# Altium PCB ScreenerMobo.PcbDoc (part 2 of 5)
Units mm, origin at the board's own origin, x right, y up, seen from the top; angles counter-clockwise.
Board outline 145 x 180 mm, 2 copper layers (Top Layer, Bottom Layer); 434 components, 355 nets, 1806 pads, 3000 vias.
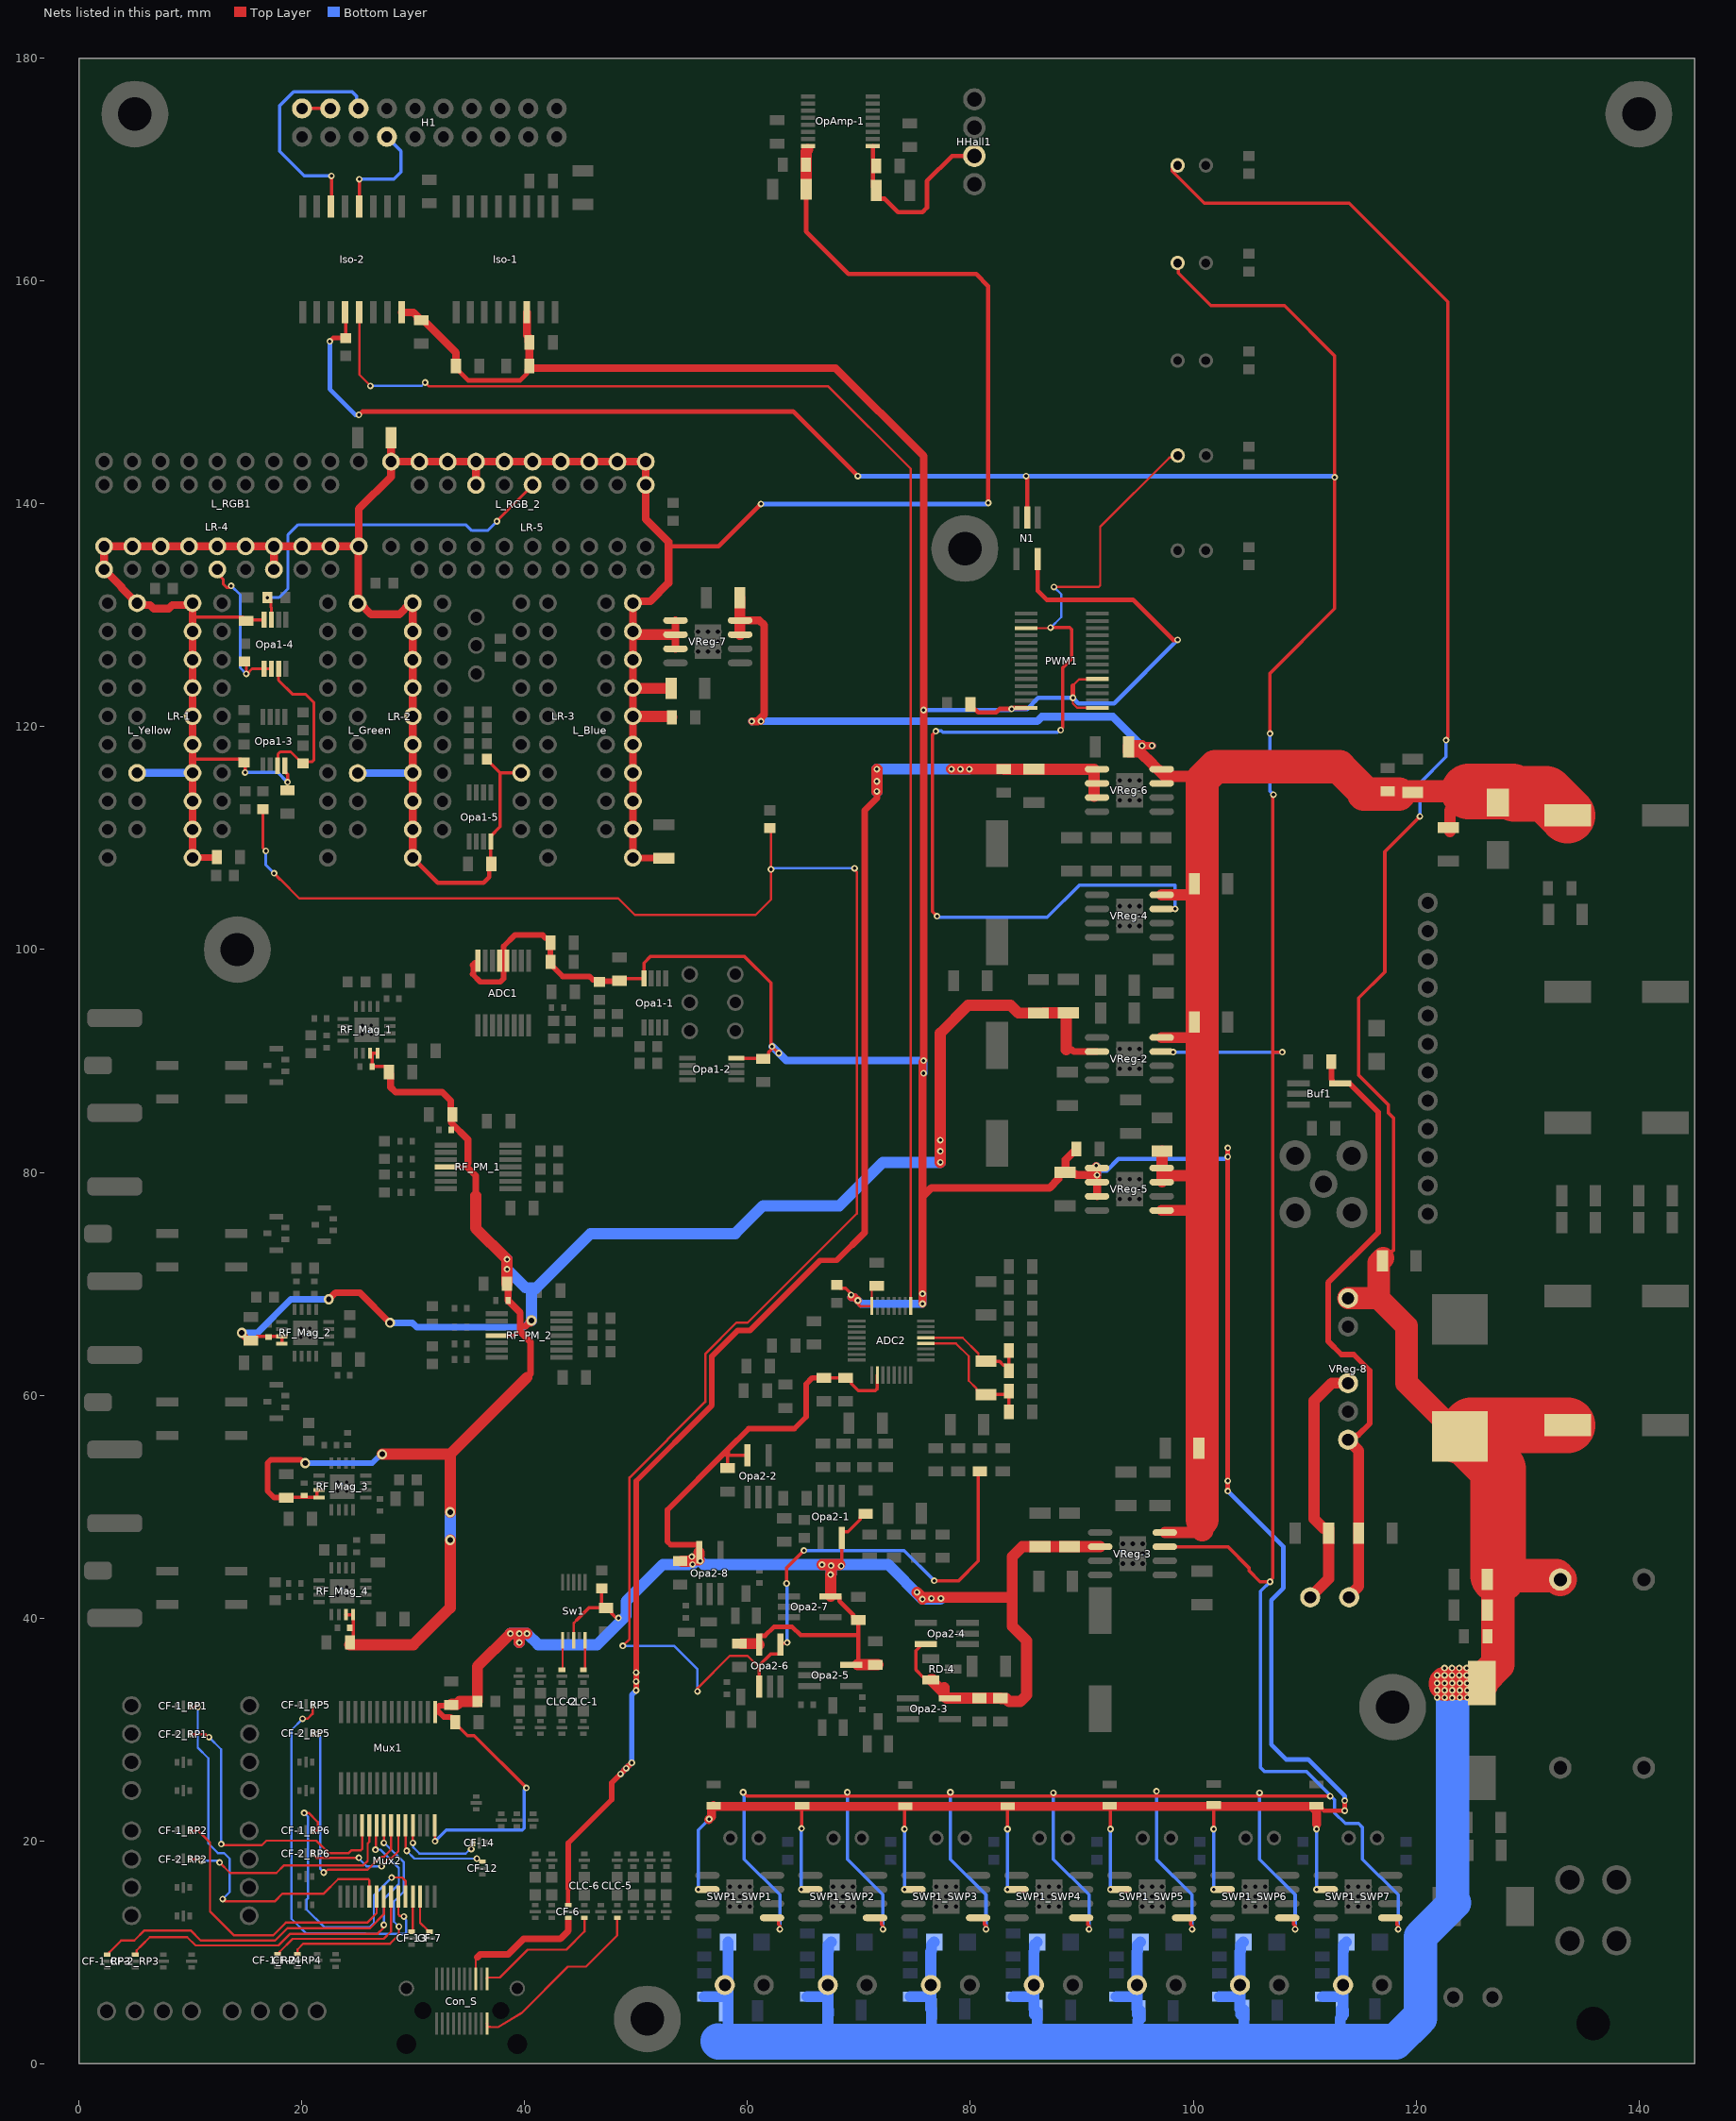
[diagram p2: the nets of this part, all layers, seen from the top]

## Via types
v1: diameter 0.6, hole 0.3, Top Layer to Bottom Layer, tented both sides, 1967 vias
v2: diameter 0.5, hole 0.25, Top Layer to Bottom Layer, tented both sides, 1025 vias
v3: diameter 0.9, hole 0.5, Top Layer to Bottom Layer, tented both sides, 8 vias

## Nets (pads, with @x,y where several pads share a name; then routed paths per layer and width w, separated by ;. In a path a pad name is that pad's centre, name@x,y a point inside that pad or via, vN(x,y) a via of type N, cw(c..) or ccw(c..) an arc to the next point about the centre after c; other vN are vias at no path point) (continued)
3V3_SWP1: ADC1.12 ADC1.13 ADC1.16 ADC2.16 C1-2.1 C1-4.2 C1-5.2 C1-6.2 C1-18B_SWP1.1 C1-18B_SWP2.1 C1-18B_SWP3.1 C1-18B_SWP4.1 C1-18B_SWP5.1 C1-18B_SWP6.1 C1-18B_SWP7.1 C1-20.1 C1-21.1 C1-24.1 C1-25.1 C1-31.2 C5-17.1 Iso-1.14 Iso-2.16 N1.5 Opa1-1.8 Opa1-2.8 PWM1.1 PWM1.5 PWM1.28 R1-3.2 R1-13.2 R13-1.2 R13-2.1 SWP1_SWP1.2 SWP1_SWP2.2 SWP1_SWP3.2 SWP1_SWP4.2 SWP1_SWP5.2 SWP1_SWP6.2 SWP1_SWP7.2 VReg-5.1 VReg-5.2 VReg-5.3 | length 487.8
  Top Layer w0.2: 70.1,68 ADC2.16@71.15,68 71.15,69.45 71.5,69.8 C1-31.2@71.6,69.8 ; v1(89.2,122.6) 89.2,122.1 89.6,121.7 PWM1.1@91.4,121.7 ; 89.2,123.7 89.75,124.25 91.35,124.25 PWM1.5@91.4,124.3
  Top Layer w0.3: C1-24.1@48.5,97.2 48.7,97.4 Opa1-1.8@50.7,97.4 50.7,98.8 51.3,99.4 59.7,99.4 62.1,97 62.1,91 61.9,90.8 61.9,90.5 61.65,90.25 Opa1-2.8@59,90.25 ; v1(55.574,15.624) SWP1_SWP1.2@56.39,15.624 ; v1@56.5,21.9 v1(56.55,21.95) ; v1(62.2,91.3) v1(62.8,90.7) ; v1(64.824,15.624) SWP1_SWP2.2@65.64,15.624 ; v1(64.85,21.1) 64.85,23.076 C1-18B_SWP2.1@64.85,23.208 ; R1-13.2@68,69.9 68.3,69.6 68.8,69.6 69.6,68.8 ; v1@69.3,68.8 70.1,68 ; v1(74.074,15.624) SWP1_SWP3.2@74.89,15.624 ; v1(74.074,21.05) 74.074,23.076 C1-18B_SWP3.1@74.074,23.1 ; v1(83.324,15.624) SWP1_SWP4.2@84.14,15.624 ; v1(83.324,21.05) 83.324,23.076 C1-18B_SWP4.1@83.324,23.1 ; v1(92.574,15.624) SWP1_SWP5.2@93.39,15.624 ; v1(92.574,21.05) 92.574,23.076 C1-18B_SWP5.1@92.574,23.15 ; v1(101.824,15.624) SWP1_SWP6.2@102.64,15.624 ; v1(101.824,21.05) 101.824,23.076 C1-18B_SWP6.1@101.824,23.2 ; v1(111.074,15.624) SWP1_SWP7.2@111.89,15.624 ; v1(111.074,21.05) 111.074,21.474
  Top Layer w0.4: R13-1.2@33.82,152.4 33.82,152.2 34.92,151.1 39.6,151.1 40.17,151.67 40.17,152.05 R13-2.1@40.42,152.3 ; C1-20.1@80,122 80,121.8 80.25,121.55 80.45,121.55 80.7,121.3 82.3,121.3 82.6,121.6 v1(83.7,121.6) 83.754,121.6 83.854,121.7 PWM1.28@85,121.7 ; N1.5@86.05,135.05 86.05,132.2 86.85,131.4 94.6,131.4 98.2,127.8 v1(98.6,127.8) ; v1(89.2,122.6) 89.2,123.7 ; v1(103.1,51.4) v1(103.1,52.3) v1(103.1,81.4) v1(103.1,82.2) ; C1-18B_SWP7.1@111.05,23.15 111.35,23.15 111.5,23 111.5,22.934 111.734,22.7 v1(113.6,22.7) v1(113.6,23.6)
  Top Layer w0.5: 35.3,97.8 36,97.1 37.807,97.1 38.1,97.393 38.1,100.3 39.1,101.3 41.6,101.3 41.9,101 42.1,101 42.3,100.8 C1-5.2@42.3,100.6 C1-6.2@42.3,98.9 42.3,98.7 43.4,97.6 45.8,97.6 46.1,97.3 46.6,97.3 46.75,97.15 48.45,97.15 C1-24.1@48.5,97.2 ; 35.3,98.6 35.5,98.8 ; 35.4,97.8 35.4,98.6
  Top Layer w0.7: Iso-2.16@28.96,157.2 30.01,157.2 30.42,156.79 30.42,156.6 30.52,156.5 C1-2.1@30.72,156.5 30.92,156.5 31.02,156.4 31.02,156.38 33.818,153.582 33.818,152.402 R13-1.2@33.82,152.4 ; Iso-1.14@40.19,157.2 40.19,155.15 40.32,155.02 40.32,154.6 C1-4.2@40.42,154.5 R13-2.1@40.42,152.4 40.42,152.3 40.52,152.2 67.9,152.2 75.8,144.3 v1(75.8,121.5) 75.8,90.039 v1(75.799,90.038) 75.7,89.939 75.7,77.8 ; v1@69.3,68.8 69.6,68.8 v1(69.9,68.5) ; v1(75.7,68.2) v1(75.7,69.1) 75.7,77.8 ; C1-21.1@89.5,82.1 89.5,81.9 89.4,81.8 89.2,81.8 88.54,81.14 88.54,80.04 C5-17.1@88.5,80 ; v1@91.3,79.827 v1(91.3,80.6) ; VReg-5.3@91.368,77.854 VReg-5.2@91.368,79.124 v1(91.368,79.759) ; VReg-5.1@91.368,80.394 v1(91.368,79.759) ; 75.7,77.8 76.5,78.6 87.1,78.6 87.9,79.4 87.9,79.85 88.05,80 C5-17.1@88.5,80 ; C5-17.1@88.5,80 88.65,79.85 89.419,79.85 89.51,79.759 v1(91.368,79.759)
  Top Layer w0.8: v1@56.5,21.9 56.766,22.166 56.766,23.1 56.9,23.1 C1-18B_SWP1.1@56.95,23.15 ; C1-18B_SWP1.1@56.976,23.076 64.85,23.076 74.074,23.076 83.324,23.076 92.574,23.076 101.824,23.076 110.605,23.076 111.074,22.607 111.074,21.474
  Bottom Layer w0.3: v1(55.574,15.624) 55.574,20.974 v1(56.55,21.95) ; v1(64.824,15.624) v1@64.824,21.05 ; v1(74.074,15.624) v1(74.074,21.05) ; v1(83.324,15.624) v1(83.324,21.05) ; v1(92.574,15.624) v1(92.574,21.05) ; v1(101.824,15.624) v1(101.824,21.05) ; v1(111.074,15.624) v1(111.074,21.05)
  Bottom Layer w0.4: v1@75.834,121.5 83.546,121.5 83.646,121.6 v1(83.7,121.6) 85.1,121.6 86.1,122.6 v1(89.2,122.6) 89.7,122.1 92.9,122.1 v1(98.6,127.8) ; 91.368,80.146 92.246,80.146 93.3,81.2 102.9,81.2 v1(103.1,81.4) v1(103.1,82.2) ; v1(103.1,52.3) v1(103.1,51.4) 108.1,46.4 108.1,42.7 107,41.6 107,28.634 108.334,27.3 110.3,27.3 113.6,24 v1(113.6,23.6) v1(113.6,22.7)
  Bottom Layer w0.7: v1(62.2,91.3) 63.462,90.038 v1(75.799,90.038) 75.799,88.901 v1(75.8,88.9) ; v1@69.3,68.8 69.6,68.8 ; v1(69.9,68.5) 70.2,68.2 v1(75.7,68.2) v1(75.7,69.1) ; v1(91.3,80.6) 91.368,80.532 91.368,80.146 v1(91.368,79.759)
  other v1: 69.3,69
5V: ADC2.26 C1-30.2 C1-32.2 C1-33.2 C1-34.1 C1-35.1 C1-36.2 C1-37.1 C1-38.1 C1-39.1 C1-40.1 C1-41.1 C1-42.1 C6-9.2 C6-10.2 C7-1.2 Mux1.1 Mux2.1 Opa2-1.5 Opa2-2.5 Opa2-3.5 Opa2-4.5 Opa2-5.5 Opa2-6.5 Opa2-7.5 Opa2-8.5 R1-14.2 R1-16.1 RD-4.2 Sw1.8 VReg-3.2 | length 210.3
  Top Layer w0.2: Mux2.1@31.9,21.4 31.95,21.35 v1(31.95,19.95) ; Sw1.8@44.4,38 44.4,39.55 44.65,39.8
  Top Layer w0.3: C1-35.1@33.55,30.75 33.55,30.55 33.85,30.25 34.05,30.25 34.85,29.45 35.45,29.45 v1(40.15,24.75) ; 44.65,39.8 45.75,40.9 C1-36.2@47.2,40.9 ; R1-16.1@46.9,42.65 46.9,41.2 C1-36.2@47.2,40.9 ; v1(48.4,40) 48.2,40 47.8,40.4 47.8,40.6 47.5,40.9 C1-36.2@47.3,40.9 C1-36.2@47.2,40.9 ; C1-33.2@58.2,53.45 58.2,54.6 Opa2-2.5@60,54.6 ; C1-30.2@66.85,61.55 C7-1.2@68.8,61.55 69,61.55 69.3,61.25 69.3,61.05 69.95,60.4 71.45,60.4 71.65,60.6 ADC2.26@71.65,61.8 ; v1(68.397,44.668) 68.45,44.721 Opa2-1.5@68.45,47.2 68.45,47.624 68.575,47.749 68.999,47.749 70.1,48.85 70.1,49.05 70.4,49.35 C1-32.2@70.6,49.35 ; Opa2-4.5@75.351,37.525 75.476,37.65 Opa2-4.5@76,37.65 ; Opa2-4.5@75.588,37.538 75.1,37.05 75.1,35.35 75.75,34.7 76.2,34.7 RD-4.2@76.45,34.45 RD-4.2@76.7,34.2
  Top Layer w0.4: Opa2-6.5@61.05,37.6 61.05,38.325 61.125,38.4 61.566,38.4 62.366,39.2 64,39.2 64.75,38.45 69.95,38.45 ; Opa2-7.5@67.45,41.875 68.25,41.875 68.25,41.5 69.5,40.25 69.5,40.05 69.75,39.8 C1-41.1@69.95,39.8 69.95,38.45 ; Opa2-5.5@69.3,35.8 69.866,35.8 69.941,35.875 69.941,36.441 69.95,36.45 69.95,38.45
  Top Layer w0.5: 32.2,31.65 32.745,31.105 33.35,31.105 33.55,30.905 C1-35.1@33.55,30.75 ; 32.2,32 32.32,32.12 33.32,32.12 C1-34.1@33.4,32.2 ; Opa2-8.5@55.65,45.9 55.65,46.543 55.625,46.568 53.093,46.568 52.8,46.861 52.8,49.7 58.2,55.1 ; v1(55.75,45.1) Opa2-8.5@55.75,45.127 ; 58.2,54.6 58.2,55.1 ; C1-30.2@66.85,61.55 65.8,61.55 65.25,61 65.25,58.05 64.2,57 60.1,57 58.2,55.1
  Top Layer w1: C1-34.1@33.45,32.25 33.914,32.25 34.164,32.5 R1-14.2@35.75,32.5 35.75,35.65 v1(38.7,38.6) v1(39.5,38.6) ; v1(39.5,37.8) v1(39.5,38.6) ; v1(40.2,38.6) v1(39.5,38.6) ; C1-42.1@54.1,45.1 54.85,45.1 54.925,45.175 55.2,45.175 55.65,45.625 Opa2-8.5@55.65,45.9 ; 55.25,45.2 Opa2-8.5@55.65,45.2 ; C1-40.1@59.45,37.7 60.95,37.7 Opa2-6.5@61.05,37.6 ; v1(66.679,44.788) v1@68.278,44.788 ; Opa2-7.5@67.45,41.95 v1(67.45,43.9) ; v1@67.5,43.95 v1(67.5,44.7) ; Opa2-5.5@69.866,35.8 C1-39.1@71.45,35.8 C1-39.1@71.7,35.8 ; v1(75.2,42.3) 75.694,41.806 v1(75.694,41.694) 75.85,41.85 83.75,41.85 ; RD-4.2@76.45,34.45 76.6,34.45 76.7,34.35 76.7,34.2 77.65,33.25 ; 77.65,33.75 77.65,33.25 ; VReg-3.2@91.65,46.4 C6-9.2@88.9,46.4 86.701,46.4 C6-10.2@86.251,46.4 84.637,46.4 83.75,45.513 83.75,41.85 ; 77.65,33.25 77.65,33.025 77.875,32.8 Opa2-3.5@78.15,32.8 C1-37.1@80.8,32.8 C1-38.1@82.7,32.8 82.75,32.75 83.214,32.75 83.464,32.5 84.464,32.5 85.05,33.086 85.05,37.95 83.75,39.25 83.75,41.85
  Bottom Layer w0.3: v1(31.95,19.95) 32.95,20.95 39.774,20.95 39.95,21.126 39.95,24.55 v1(40.15,24.75)
  Bottom Layer w1: v1(38.7,38.6) v1(39.5,38.6) ; v1(39.5,37.8) v1(39.5,38.6) ; v1(67.45,43.9) 67.495,43.945 v1@67.495,44.8 ; v1(77.35,41.75) 77.294,41.694 v1(75.694,41.694) 72.589,44.8 v1@67.495,44.8 ; v1(39.5,38.6) v1(40.2,38.6) 41.2,37.6 46.5,37.6 49.1,40.2 49.1,41.5 52.4,44.8 v1(55.05,44.8) 55.35,45.1 v1(55.75,45.1) 56.05,44.8 v1@67.495,44.8
  other v1: 76.5,41.75 55,45.5
5V_HallIso: C1-45.1 C5-25.1 HHall1.3 OpAmp-1.1 | length 17
  Top Layer w0.4: OpAmp-1.1@71.25,172.14 71.25,168.45 C5-25.1@71.55,168.15 ; C5-25.1@71.55,167.701 71.85,167.401 72.299,167.401 73.5,166.2 75.7,166.2 76.1,166.6 76.1,169 78.35,171.25 HHall1.3@80.35,171.25
5V_Messy: C1-23.1 C1-26.1 C1-27.2 C1-28.2 C1-29.2 C1-44.2 C5-21.1 C5-22.2 C5-23.2 C5-24.2 L_Blue.1 L_Blue.2 L_Blue.3 L_Blue.4 L_Blue.5 L_Blue.6 L_Blue.7 L_Blue.8 L_Blue.9 L_Blue.10 L_Green.1 L_Green.2 L_Green.3 L_Green.4 L_Green.5 L_Green.6 L_Green.7 L_Green.8 L_Green.9 L_Green.10 L_RGB1.1 L_RGB1.2 L_RGB1.3 L_RGB1.4 L_RGB1.5 L_RGB1.6 L_RGB1.7 L_RGB1.8 L_RGB1.9 L_RGB1.10 L_RGB_2.1 L_RGB_2.2 L_RGB_2.3 L_RGB_2.4 L_RGB_2.5 L_RGB_2.6 L_RGB_2.7 L_RGB_2.8 L_RGB_2.9 L_RGB_2.10 L_Yellow.1 L_Yellow.2 L_Yellow.3 L_Yellow.4 L_Yellow.5 L_Yellow.6 L_Yellow.7 L_Yellow.8 L_Yellow.9 L_Yellow.10 LR-1.3 LR-1.9 LR-2.3 LR-2.9 LR-3.3 LR-4.3 LR-4.9 LR-5.3 LR-5.9 Opa1-3.8 Opa1-4.8 Opa1-5.8 OpAmp-1.16 R1-6.1 R1-7.1 VReg-7.1 VReg-7.2 VReg-7.3 | length 311.4
  Top Layer w0.3: 10.18,117.13 10.21,117.1 14.5,117.1 R1-6.1@14.8,116.8 14.9,116.7 v1(14.9,115.9) ; 10.18,129.83 10.21,129.8 ; 10.21,129.85 C1-28.2@14.7,129.85 ; C1-28.2@14.7,129.8 C1-28.2@15,129.5 15.1,129.6 Opa1-4.8@16.6,129.6 ; Opa1-3.8@18.45,116.5 18.45,116 18.7,115.75 v1(18.7,115.025) ; R1-7.1@36.6,117.1 36.6,117.05 37.79,115.86 ; C1-29.2@37,107.7 36.95,107.75 Opa1-5.8@36.95,109.7 36.95,110.2 37.79,111.04 37.79,115.86 ; LR-3.3@39.8,115.74 LR-3.3@39.68,115.86 37.79,115.86
  Top Layer w0.4: L_Green.1@29.94,108.24 32.18,106 36.3,106 36.8,106.5 36.8,107.5 C1-29.2@37,107.7 ; 52.9,136.2 57.4,136.2 v1(61.2,140) ; C5-24.2@65.25,168.25 65.25,164.45 69.05,160.65 80.516,160.65 81.6,159.566 v1(81.6,140.1)
  Top Layer w0.6: L_Yellow.1@10.18,108.24 10.21,108.27 12.32,108.27 C1-27.2@12.35,108.3 C1-27.2@12.37,108.32 ; L_Blue.1@49.7,108.24 49.72,108.22 52.48,108.22 C5-22.2@52.5,108.2
  Top Layer w0.7: L_Yellow.1@10.18,108.24 L_Yellow.2@10.18,110.78 L_Yellow.3@10.18,113.32 L_Yellow.4@10.18,115.86 10.18,117.13 L_Yellow.5@10.18,118.4 L_Yellow.6@10.18,120.94 L_Yellow.7@10.18,123.48 L_Yellow.8@10.18,126.02 L_Yellow.9@10.18,128.56 10.18,129.83 L_Yellow.10@10.18,131.1 10.008,130.928 8.364,130.928 8.036,130.6 6.7,130.6 6.372,130.928 5.372,130.928 LR-1.9@5.2,131.1 3.8,132.5 3.8,132.56 LR-4.9@2.24,134.12 L_RGB1.1@2.24,136.192 L_RGB1.2@4.78,136.192 L_RGB1.3@7.32,136.192 L_RGB1.4@9.86,136.192 L_RGB1.5@12.4,136.192 L_RGB1.6@14.94,136.192 L_RGB1.7@17.48,136.192 ; LR-4.3@17.48,134.12 L_RGB1.7@17.48,136.192 ; C5-23.2@28,145.95 L_RGB_2.10@28,143.8 ; L_Green.1@29.94,108.24 L_Green.2@29.94,110.78 L_Green.3@29.94,113.32 L_Green.4@29.94,115.86 L_Green.5@29.94,118.4 L_Green.6@29.94,120.94 L_Green.7@29.94,123.48 L_Green.8@29.94,126.02 L_Green.9@29.94,128.56 L_Green.10@29.94,131.1 29.73,131.1 28.73,130.1 26.21,130.1 25.23,131.08 LR-2.9@25,131.08 25.05,131.13 25.05,136.142 L_RGB1.10@25.1,136.192 ; LR-5.3@35.62,141.72 L_RGB_2.7@35.62,143.8 ; L_Blue.1@49.7,108.24 L_Blue.2@49.7,110.78 L_Blue.3@49.7,113.32 L_Blue.4@49.7,115.86 L_Blue.5@49.7,118.4 L_Blue.6@49.7,120.94 L_Blue.7@49.7,123.48 L_Blue.8@49.7,126.02 L_Blue.9@49.7,128.56 L_Blue.10@49.7,131.1 49.872,131.272 51.272,131.272 52.9,132.9 52.9,136.2 52.9,136.6 50.86,138.64 LR-5.9@50.86,141.72 L_RGB_2.1@50.86,143.8 L_RGB_2.2@48.32,143.8 L_RGB_2.3@45.78,143.8 L_RGB_2.4@43.24,143.8 L_RGB_2.5@40.7,143.8 L_RGB_2.6@38.16,143.8 L_RGB_2.7@35.62,143.8 ; VReg-7.3@53.529,127.004 VReg-7.2@53.529,128.274 VReg-7.1@53.529,129.544 ; L_RGB1.7@17.48,136.192 L_RGB1.8@20.02,136.192 L_RGB1.9@22.56,136.192 L_RGB1.10@25.1,136.192 ; L_RGB1.10@25.1,136.192 25.1,139.55 28,142.45 L_RGB_2.10@28,143.8 ; L_RGB_2.10@28,143.8 L_RGB_2.9@30.54,143.8 L_RGB_2.8@33.08,143.8 L_RGB_2.7@35.62,143.8
  Top Layer w1: L_Blue.6@49.7,120.94 53.15,120.94 53.2,120.89 C1-23.1@53.2,120.85 ; L_Blue.7@49.7,123.48 49.73,123.45 C5-21.1@53.15,123.45 ; L_Blue.9@49.7,128.56 49.862,128.56 50.148,128.274 VReg-7.2@53.529,128.274 ; C5-24.2@65.25,168.25 C1-44.2@65.25,170.45 65.25,171.65 65.4,171.8
  Bottom Layer w0.3: v1(14.9,115.9) 17.825,115.9 v1(18.7,115.025)
  Bottom Layer w0.4: v1(61.2,140) 81.446,140 81.546,140.1 v1(81.6,140.1)
  Bottom Layer w0.7: LR-1.3@5.2,115.86 L_Yellow.4@10.18,115.86 ; LR-2.3@25,115.84 25.01,115.85 29.93,115.85 L_Green.4@29.94,115.86
5V_Sensors: C1-22.1 C5-19.1 CF-6.2 VReg-6.1 VReg-6.2 VReg-6.3 | length 143.3
  Top Layer w0.4: CF-6.2@43.887,14.225 43.887,15.687
  Top Layer w0.5: 43.887,15.687 43.9,15.7 43.9,19.8 47.8,23.7 47.8,25.2 v1(48.6,26) v1(49.1,26.5) v1(49.6,27) ; v1(50,33.5) v1(50,34.3) v1(50,35.1) 50,52.3 56.8,59.1 56.8,63.5 59.1,65.8 60.2,65.8 66.5,72.1 68,72.1 69.4,73.5
  Top Layer w0.6: 69.4,73.5 70.5,74.6 70.5,112.5 71.6,113.6 v1(71.6,114.2)
  Top Layer w1: v1(71.6,114.2) v1(71.6,115.1) v1(71.6,116.2) ; v1(78.3,116.2) v1(79.1,116.2) v1(79.9,116.2) C1-22.1@83,116.2 83.006,116.194 85.7,116.194 91.1,116.194 VReg-6.3@91.1,113.78
  Bottom Layer w0.5: v1(48.6,26) v1(49.1,26.5) v1(49.6,27) 49.6,33.1 v1(50,33.5) v1(50,34.3) ; v1@50,34.4 v1(50,35.1)
  Bottom Layer w1: v1(71.6,114.2) v1(71.6,115.1) v1(71.6,116.2) v1(78.3,116.2) v1(79.1,116.2) ; v1@79.2,116.2 v1(79.9,116.2)
5V_Sensors_Con: CF-6.1 Con_S.6 | length 12
  Top Layer w0.2: Con_S.6@35.6,7.6 35.6,9.4 35.75,9.55
  Top Layer w0.6: 35.75,9.55 36,9.8 38.5,9.8 39.9,11.2 43.2,11.2 43.9,11.9 43.9,12.8
5V_Switch: Buf1.5 C1-43.1 C6-21.2 HP-4.2 VReg-8.6 | length 56.1
  Top Layer w0.5: C1-43.1@112.4,89.45 112.407,89.443 112.407,88.343 112.45,88.3 112.45,88.025 112.5,87.975 114.025,87.975 116.6,85.4 116.6,74.6 112.1,70.1 112.1,64.85 113.3,63.65 114.4,63.65 115.85,62.2 115.85,57.45 114.817,56.417 114.669,56.417 114.252,56 VReg-8.6@113.9,56
  Top Layer w1: VReg-8.6@113.9,56 113.9,55.964 114.85,55.014 C6-21.2@114.85,47.6 114.85,42.836 114,41.986 HP-4.2@114,41.85
5VRF: C1-7.2 C1-8.2 C1-9.2 C1-10.2 C1-15.2 C1-16.2 C2-21.2 C3-1.2 C3-4.2 C3-7.2 C3-10.2 C3-22.2 C6-4.2 C6-5.2 RF_Mag_1.3 RF_Mag_1.4 RF_Mag_2.3 RF_Mag_2.4 RF_Mag_3.3 RF_Mag_3.4 RF_Mag_4.3 RF_Mag_4.4 RF_PM_1.4 RF_PM_2.4 VReg-2.2 | length 221.3
  Top Layer w0.3: C1-8.2@15.4,64.9 15.6,64.9 15.975,65.275 RF_Mag_2.3@18.2,65.275 RF_Mag_2.4@18.2,64.625 ; C1-9.2@18.6,50.8 18.625,50.825 21.3,50.825 21.325,50.85 21.325,51.45 21.35,51.475 RF_Mag_3.3@21.525,51.475 ; RF_Mag_4.3@23.95,40.3 RF_Mag_4.4@24.6,40.3 24.6,37.9 C1-10.2@24.3,37.6 ; RF_Mag_1.3@26.125,90.7 26.3,90.7 ; RF_Mag_1.4@26.8,90.7 26.3,90.7 ; C1-7.2@27.8,89 27.8,89.2 27.5,89.5 C3-1.2@26.3,89.5 26.3,90.7 ; RF_PM_1.4@32.9,80.5 34.6,80.5 34.7,80.6 ; 33.4,84.45 33.4,85.1 C1-15.2@33.5,85.2 ; RF_PM_2.4@37.5,65.35 39.15,65.35 39.6,65.8
  Top Layer w0.5: C1-9.2@18.6,50.8 18.593,50.807 17.493,50.807 16.9,51.4 16.9,53.9 17.2,54.2 19.892,54.2 20.192,53.9 v3(20.3,53.9)
  Top Layer w0.6: v3(14.6,65.6) 14.657,65.543 14.657,65.443 15.2,64.9 C1-8.2@15.4,64.9 ; v3(22.4,68.6) 23,69.2 25.2,69.2 v3(27.9,66.5) ; C1-7.2@27.8,89 27.95,88.85 27.95,87.65 28.4,87.2 32.6,87.2 33.35,86.45 33.35,85.35 C1-15.2@33.5,85.2 ; 33.4,84.45 34.9,82.95 34.9,80.8 34.7,80.6 35.6,79.7 35.6,77.9 ; C1-16.2@38.4,70 38.5,69.9 C3-22.2@38.5,68.5 39.6,67.4 39.6,66.2 ; 40.2,61.6 40.5,61.9 40.5,64.8 39.6,65.7 39.6,65.8 39.6,66.2 ; v3@40.5,66.6 40.1,66.2 39.6,66.2 ; 88.6,91 89.1,91 89.265,90.835 VReg-2.2@91.368,90.835
  Top Layer w0.9: v3@40.5,66.6 v3(40.6,66.7)
  Top Layer w1: C1-10.2@24.3,37.6 30,37.6 33.3,40.9 v3(33.3,47) ; v3(27.2,54.7) 33.3,54.7 ; v3(33.3,49.5) 33.3,54.7 ; 35.6,77.9 35.6,75 v1(38.4,72.2) v1(38.4,71.3) C1-16.2@38.4,70 ; 40.2,61.6 33.3,54.7 ; v1(77.3,80.9) v1(77.3,81.9) v1(77.3,82.9) 77.3,92.5 79.8,95 83.6,95 84.3,94.3 C6-5.2@86.1,94.3 86.55,94.3 86.575,94.325 88.6,94.325 88.6,91
  Bottom Layer w0.5: v3(20.3,53.9) 26.303,53.9 27.103,54.7 v3(27.2,54.7)
  Bottom Layer w0.6: v3(14.6,65.6) 16,65.6 19,68.6 v3(22.4,68.6) ; v3(27.9,66.5) 29.9,66.5 30.3,66.1 39.919,66.1 40.519,66.7 v3(40.6,66.7)
  Bottom Layer w1: v3(33.3,47) v3(33.3,49.5) ; v1(38.4,72.2) v1(38.4,71.3) 40.05,69.65 40.6,69.65 41.05,69.65 ; v3(40.6,66.7) 40.6,69.2 41.05,69.65 ; v1(77.3,81.9) v1(77.3,80.9) 72.15,80.9 68.25,77 61.4,77 58.9,74.5 45.9,74.5 41.05,69.65 ; v1@77.3,82 v1(77.3,82.9)
6V5: C1-17.1 C5-10.2 C5-11.2 C5-16.1 C5-18.1 C5-20.1 C6-3.1 C6-12.1 C6-13.1 CE3-5.1 I2.2 VReg-2.8 VReg-3.8 VReg-4.8 VReg-5.5 VReg-5.7 VReg-5.8 VReg-6.7 VReg-6.8 VReg-7.7 VReg-7.8 | length 188
  Top Layer w0.7: VReg-7.8@59.329,129.544 61.073,129.544 61.483,129.134 61.483,121.083 60.893,120.493 v1(60.383,120.493) 60.39,120.5 v1(61.2,120.5) ; 95.7,118.3 v1(96.3,118.3)
  Top Layer w1: C5-20.1@59.3,131.6 59.3,128.303 VReg-7.7@59.329,128.274 ; C5-18.1@94.2,118.2 94.2,117.75 95.25,117.75 96.368,116.632 96.368,116.594 VReg-6.8@96.568,116.394 ; C5-18.1@94.2,118.3 v1(95.4,118.3) ; VReg-6.8@96.806,116.194 97.441,115.559 100.469,115.559 100.8,115.228 ; VReg-5.5@97.168,76.584 100.616,76.584 ; VReg-2.8@97.168,92.105 99.805,92.105 ; VReg-4.8@97.168,104.916 100.616,104.916 ; VReg-5.7@97.2,79.156 97.2,79.7 ; C5-16.1@97.2,81.9 97.2,79.7 ; VReg-3.8@97.45,47.67 100.62,47.67 ; C6-3.1@99.805,94.105 100.8,95.1 ; 100.616,78.584 100.8,78.4 ; 100.616,106.916 100.8,107.1 ; 100.8,79.7 97.2,79.7 ; C5-11.2@123.05,110.6 123.05,112.5
  Top Layer w2: 100.8,47.85 100.8,48.85 ; 118.45,114.2 124.75,114.2
  Top Layer w3: 100.8,48.85 100.8,78.4 100.8,95.1 100.8,107.1 100.8,115.228 101.972,116.4 113.1,116.4 115.3,114.2 ; 115.3,113.95 118.45,113.95
  Top Layer w5: 124.75,114.2 128.65,114.2 128.85,114 131.65,114 CE3-5.1@133.6,112.05
  Bottom Layer w0.7: v1(60.383,120.493) 60.39,120.5 86,120.5 86.4,120.9 92.8,120.9 v1(95.4,118.3) v1(96.3,118.3)
12V_SWP1: C1-18.1 C1-18_SWP1.1 C1-18_SWP2.1 C1-18_SWP3.1 C1-18_SWP4.1 C1-18_SWP5.1 C1-18_SWP6.1 C1-18_SWP7.1 C5-1.2 C5-2.2 C5-3_SWP1.2 C5-3_SWP2.2 C5-3_SWP3.2 C5-3_SWP4.2 C5-3_SWP5.2 C5-3_SWP6.2 C5-3_SWP7.2 C6-19.2 CE1-1.1 CE3-1.1 D1_SWP1.1 D1_SWP2.1 D1_SWP3.1 D1_SWP4.1 D1_SWP5.1 D1_SWP6.1 D1_SWP7.1 F-1.1 HP-1_SWP1.1 HP-1_SWP2.1 HP-1_SWP3.1 HP-1_SWP4.1 HP-1_SWP5.1 HP-1_SWP6.1 HP-1_SWP7.1 I1.1 LL-5.1 VReg-8.1 | length 361.9
  Top Layer w0.3: LL-5.1@98.6,170.4 98.4,170.4 98.124,170.124 98.124,169.876 101,167 114,167 122.85,158.15 122.85,119.031 122.7,118.881 v1(122.7,118.8) ; C6-19.2@117,72.05 117,72.25 117,72.443 117.35,72.793 117.743,72.793 118,73.05 118,84.85 117.5,85.35 117.5,86.08 114.85,88.73 114.85,95.65 117.2,98 117.2,108.8 v1(120.35,111.95)
  Top Layer w2: VReg-8.1@113.9,68.7 116.65,68.7 ; C6-19.2@117.05,72.3 117,72.25 116.65,71.9 116.65,68.7 ; I1.1@123.95,56.3 123.7,56.3 122.45,57.55 122.45,57.8 119.15,61.1 119.15,66.2 116.65,68.7
  Top Layer w3: v1@122.65,34.05 v1@122.65,34.15 ; v1@123.284,34.15 v1(123.919,34.15) v1(124.592,34.15) F-1.1@125.9,34.15 125.9,34.4 127.35,35.85 127.35,43.8 ; 127.6,44.05 127.35,43.8 ; CE1-1.1@132.95,43.45 132.6,43.8 127.35,43.8
  Top Layer w5: 127.35,43.8 127.35,53.371 124.421,56.3 I1.1@123.95,56.3 124.95,57.3 CE3-1.1@133.6,57.3
  Bottom Layer w0.3: v1(120.35,111.95) 120.35,114.95 122.7,117.3 v1(122.7,118.8)
  Bottom Layer w1: C1-18_SWP1.1@56.1,6 58.25,6 ; 57.9,2.45 58.25,2.45 58.25,6 ; D1_SWP1.1@58.25,10.9 58.25,6 ; C1-18_SWP2.1@65.35,6 67,6 HP-1_SWP2.1@67.2,6.2 ; 67.2,2.1 C5-3_SWP2.2@67.2,4.65 ; C5-3_SWP2.2@67.25,4.4 67.25,4.85 67.2,4.9 HP-1_SWP2.1@67.2,6.2 ; D1_SWP2.1@67.5,10.9 67.25,10.65 67.25,10.114 67.2,10.064 HP-1_SWP2.1@67.2,7.05 HP-1_SWP2.1@67.2,6.2 ; C1-18_SWP3.1@74.6,6 76.25,6 HP-1_SWP3.1@76.45,6.2 ; 76.5,1.95 C5-3_SWP3.2@76.5,4.85 ; C5-3_SWP3.2@76.5,4.9 C5-3_SWP3.2@76.5,4.85 ; D1_SWP3.1@76.75,10.9 76.5,10.65 76.5,10.114 76.45,10.064 HP-1_SWP3.1@76.45,7.05 HP-1_SWP3.1@76.45,6.2 ; C1-18_SWP4.1@83.85,6 85.5,6 HP-1_SWP4.1@85.7,6.2 ; C5-3_SWP4.2@85.75,4.4 85.75,4.85 85.7,4.9 HP-1_SWP4.1@85.7,6.2 ; C5-3_SWP4.2@86,4.65 86,2 86.05,1.95 ; D1_SWP4.1@86,10.9 85.75,10.65 85.75,10.114 85.7,10.064 HP-1_SWP4.1@85.7,7.05 HP-1_SWP4.1@85.7,6.2 ; C1-18_SWP5.1@93.1,6 94.75,6 HP-1_SWP5.1@94.95,6.2 ; C5-3_SWP5.2@95,4.4 95,4.85 94.95,4.9 HP-1_SWP5.1@94.95,6.2 ; 95.05,1.95 95.05,3.857 95.2,4.007 C5-3_SWP5.2@95.2,4.75 ; D1_SWP5.1@95.25,10.9 95,10.65 95,10.114 94.95,10.064 HP-1_SWP5.1@94.95,7.05 HP-1_SWP5.1@94.95,6.2 ; C1-18_SWP6.1@102.35,6 104,6 HP-1_SWP6.1@104.2,6.2 ; C5-3_SWP6.2@104.25,4.4 104.25,4.85 104.2,4.9 HP-1_SWP6.1@104.2,6.2 ; D1_SWP6.1@104.5,10.9 104.25,10.65 104.25,10.114 104.2,10.064 HP-1_SWP6.1@104.2,7.05 HP-1_SWP6.1@104.2,6.2 ; 104.55,1.95 C5-3_SWP6.2@104.55,4.8 ; C1-18_SWP7.1@111.6,6 113.25,6 HP-1_SWP7.1@113.45,6.2 ; 113.2,1.95 113.2,4.057 113.3,4.157 C5-3_SWP7.2@113.3,4.9 ; C5-3_SWP7.2@113.5,4.4 113.5,4.85 113.45,4.9 HP-1_SWP7.1@113.45,6.2 ; D1_SWP7.1@113.75,10.9 113.5,10.65 113.5,10.114 113.45,10.064 HP-1_SWP7.1@113.45,7.05 HP-1_SWP7.1@113.45,6.2 ; 123.134,27.55 123.284,27.4 ; HP-1_SWP3.1@76.45,6.2 76.45,4.9 C5-3_SWP3.2@76.5,4.85
  Bottom Layer w2: 57.4,1.95 57.9,2.45
  Bottom Layer w3: 120.4,4.05 120.4,11.4 123.434,14.434 ; 123.284,14.434 123.284,27.4 v1@123.284,34.15
  Bottom Layer w3.2: 57.35,2 57.4,1.95 76.5,1.95 ; 76.75,1.95 86.05,1.95 95.05,1.95 104.55,1.95 113.2,1.95 118.15,1.95 120.25,4.05
  other v1: 121.9,32.85 122.575,32.85 123.25,32.838 123.925,32.85 124.6,32.85 121.9,33.5 122.575,33.5 123.25,33.5 123.925,33.5 124.6,33.5 121.9,34.15 122.573,34.15 123.246,34.15 121.9,34.85 122.562,34.85 123.225,34.85 123.887,34.85 124.55,34.85 122.562,35.5 123.225,35.5 123.887,35.5 124.55,35.5
12VIn: H1.1 H1.2 | length 2.5
  Top Layer w0.3: H1.1@20,175.5 H1.2@22.54,175.5
-5V_Switch: C6-20.2 HP-4.1 VReg-8.4 | length 22.8
  Top Layer w1: HP-4.1@110.5,41.85 112.15,43.5 C6-20.2@112.15,47.6 112.15,48.05 111.7,48.05 110.85,48.9 110.85,59.5 112.43,61.08 VReg-8.4@113.9,61.08
B: Opa2-6.1 Opa2-6.4 R00.1 R1-17.1 R12-9.1 | length 203.3
  Top Layer w0.2: 18.05,106.3 19.75,104.6 48.4,104.6 49.9,103.1 60.7,103.1 62.1,104.5 v1(62.1,107.2) R00.1@62.1,110.9 ; v1(48.8,37.5) 49.4,38.1 49.4,52.6 56.2,59.4 56.2,63.7 59,66.5 60,66.5 69.8,76.3 69.8,106.992 69.6,107.192 v1(69.6,107.3) ; v1(55.5,33.4) 55.5,33.7 58.4,36.6 60,36.6 61.05,35.55
  Top Layer w0.254: R1-17.1@16.5,112.6 16.5,109.109 v1(16.754,108.855) ; v1(17.5,106.85) 18.05,106.3
  Top Layer w0.3: Opa2-6.1@61.05,33.85 61.05,35.55 61.05,35.75 62.05,36.75 62.825,36.75 62.95,36.875 Opa2-6.4@62.95,37.6 62.95,37.624 63.075,37.749 63.499,37.749 v1(63.55,37.8) ; v1(63.5,43.1) 63.5,44.5 v1(65.05,46.05) ; v1(76.75,43.35) 78.95,43.35 80.7,45.1 80.7,53 R12-9.1@80.85,53.15
  Bottom Layer w0.2: v1(48.8,37.5) 53.4,37.5 55.5,35.4 v1(55.5,33.4) ; v1(62.1,107.2) 62.2,107.3 v1(69.6,107.3)
  Bottom Layer w0.254: v1(16.754,108.855) 16.754,107.596 v1(17.5,106.85)
  Bottom Layer w0.3: v1(63.5,43.1) 63.55,43.05 v1(63.55,37.8) ; v1(65.05,46.05) 74.05,46.05 v1(76.75,43.35)
B_Display: Opa1-3.7 Opa1-4.3 R1-19.2 | length 15.1
  Top Layer w0.254: Opa1-3.7@17.8,116.5 17.85,116.55 17.85,117.55 18.05,117.75 19,117.75 20.05,116.7 R1-19.2@20.1,116.7 20.25,116.85 20.9,116.85 21.05,117 21.05,122.2 20.35,122.9 19.174,122.9 17.9,124.174 Opa1-4.3@17.9,125.2
B_LEDN: LR-5.5 Opa1-4.7 R1-11.2 | length 33.5
  Top Layer w0.254: v1(16.9,131.6) 17.223,131.277 17.223,130.733 17.25,130.706 Opa1-4.7@17.25,129.6 ; v1(37.5,138.45) 37.5,138.485 40.7,141.685 LR-5.5@40.7,141.72
  Bottom Layer w0.254: v1(16.9,131.6) 17.95,131.6 18.75,132.4 18.75,137.25 19.65,138.15 34.7,138.15 35.25,137.6 36.65,137.6 v1(37.5,138.45)
B_LEDP: LR-4.5 Opa1-4.1 Opa1-4.2 R1-12.2 | length 14.5
  Top Layer w0.254: LR-4.5@12.4,134.12 12.4,133.756 12.95,133.206 12.95,132.8 13.25,132.5 13.501,132.5 v1(13.65,132.65) ; R1-12.2@14.85,125.85 15,125.7 v1(15,124.75) 15.063,124.75 15.513,125.2 Opa1-4.1@16.6,125.2 Opa1-4.2@17.25,125.2
  Bottom Layer w0.254: v1(13.65,132.65) 14.45,131.85 14.45,125.3 v1(15,124.75)
CS: ADC2.9 Iso-2.13 | length 134
  Top Layer w0.2: Iso-2.13@25.15,157.2 25.15,151.6 v1(26.15,150.6) ; v1(31.05,150.9) 31.4,150.55 67.25,150.55 74.65,143.15 ADC2.9@74.65,68
  Bottom Layer w0.2: v1(26.15,150.6) 30.75,150.6 v1(31.05,150.9)
CS1: H1.17 Iso-2.4 | length 10.2
  Top Layer w0.3: Iso-2.4@25.15,166.7 v1(25.15,169.15)
  Bottom Layer w0.3: v1(25.15,169.15) 28.25,169.15 28.9,169.8 28.9,171.68 H1.17@27.62,172.96
d31_E: H1.3 Iso-2.6 | length 21.2
  Top Layer w0.3: Iso-2.6@22.61,166.7 22.65,166.74 v1(22.65,169.45)
  Bottom Layer w0.3: v1(22.65,169.45) 20.2,169.45 18,171.65 18,175.75 19.25,177 24.5,177 24.885,176.615 24.885,175.695 H1.3@25.08,175.5
DRTDN0: CLC-2.1 Sw1.6 | length 2.7
  Top Layer w0.2: CLC-2.1@43.333,35.35 43.4,35.417 Sw1.6@43.4,38
DRTDN1: CF-2_RP1.2 Mux2.11 | length 27.5
  Top Layer w0.2: CF-2_RP1.2@9.925,29.567 11.333,29.567 11.6,29.3 v1(11.65,29.3) ; v1(12.75,19.7) 12.85,19.6 16.4,19.6 16.804,20.004 21.292,20.004 22.395,18.9 24.2,18.9 24.45,19.15 25.283,19.15 25.4,19.268 Mux2.11@25.4,21.4
  Bottom Layer w0.2: v1(11.65,29.3) 12.75,28.2 v1(12.75,19.7)
DRTDN2: CF-2_RP2.2 Mux2.10 | length 20.2
  Top Layer w0.2: CF-2_RP2.2@9.925,18.35 10.7,18.35 10.85,18.2 v1(11,18.2) ; v1(12.6,18.05) 13.55,17.1 17.695,17.1 18.395,17.8 25.5,17.8 25.9,18.2 25.9,19.75 26.05,19.9 Mux2.10@26.05,21.4
  Bottom Layer w0.2: v1(11,18.2) 12.45,18.2 v1(12.6,18.05)
DRTDN3: CF-2_RP3.2 Mux2.9 | length 34.9
  Top Layer w0.2: CF-2_RP3.2@5.033,9.775 5.058,9.775 5.158,9.875 5.158,10.158 5.6,10.6 6.35,11.35 9.7,11.35 10.45,10.6 17.9,10.6 18.95,11.65 26.8,11.65 27.273,12.123 27.273,12.373 v1(27.35,12.45) ; v1@26.65,19.2 Mux2.9@26.65,21.35
  Bottom Layer w0.2: v1@26.65,19.2 27.05,19.2 28.7,17.55 28.7,16.1 27.35,14.75 v1(27.35,12.45)
  other v1: 26.6,19.2
DRTDN4: CF-2_RP4.2 Mux2.8 | length 21.2
  Top Layer w0.2: CF-2_RP4.2@19.6,9.825 19.6,10.25 20.1,10.75 27.9,10.75 28.7,11.55 v1(28.7,12.3) ; Mux2.8@27.35,21.4 27.35,19.85 v1@27.4,19.8
  Bottom Layer w0.2: v1@27.4,19.8 29.15,18.05 29.15,15.45 28.25,14.55 28.25,12.75 v1(28.7,12.3)
  other v1: 27.35,19.8
DRTDN5: CF-2_RP5.2 Mux2.7 | length 22.2
  Top Layer w0.2: CF-2_RP5.2@20.958,29.6 v1(21.45,29.6) ; v1(21.95,17.15) 22.058,17.15 22.308,17.4 25.9,17.4 27.05,18.55 27.35,18.55 28,19.2 Mux2.7@28,21.4
  Bottom Layer w0.2: v1(21.45,29.6) 21.45,29.492 21.65,29.292 21.65,17.467 21.95,17.167 v1(21.95,17.15)
DRTDN6: CF-2_RP6.2 Mux2.6 | length 11.2
  Top Layer w0.2: CF-2_RP6.2@20.925,18.85 20.925,18.75 21.025,18.65 21.125,18.65 21.307,18.468 v1(25.108,18.468) ; v1(27.149,17.704) 27.149,17.749 27.813,18.413 28.013,18.413 28.65,19.05 Mux2.6@28.65,21.4
  Bottom Layer w0.2: v1(25.108,18.468) 25.108,18.392 25.801,17.699 27.143,17.699 v1(27.149,17.704)
DRTDN7: CF-12.2 Mux2.5 | length 8.9
  Top Layer w0.2: Mux2.5@29.3,21.4 29.3,19.308 29.4,19.208 v1(29.4,19.1)
  Bottom Layer w0.2: v1(29.4,19.1) 30.1,18.4 v1(35.7,18.4)
DRTDN8: CF-14.2 Mux2.4 | length 8
  Top Layer w0.2: v1(29.95,19.8) Mux2.4@29.95,21.4 ; v1(35.2,19.25) 35.275,19.325 CF-14.2@35.275,19.625
  Bottom Layer w0.2: v1(29.95,19.8) 29.999,19.751 29.999,19.401 30.55,18.85 34.692,18.85 35.092,19.25 v1(35.2,19.25)
DRTDP0: CLC-1.1 Sw1.10 | length 2.7
  Top Layer w0.2: CLC-1.1@45.3,35.35 45.4,35.45 Sw1.10@45.4,38
DRTDP1: CF-1_RP1.2 Mux2.19 | length 35.5
  Top Layer w0.2: CF-1_RP1.2@9.925,32.1 10.025,32 v1@10.542,32 ; v1@10.442,32.1 v1@10.542,32 ; v1(10.65,32) v1@10.542,32 ; v1(12.874,14.762) 13.086,14.55 17.55,14.55 18.256,15.256 21.956,15.256 23.25,16.55 25.95,16.55 26.05,16.45 Mux2.19@26.05,15
  Bottom Layer w0.2: v1(10.65,32) 10.65,28.35 11.6,27.4 11.6,19.75 12.45,18.9 13,18.9 13.5,18.4 13.5,15.387 v1(12.874,14.762)
DRTDP2: CF-1_RP2.2 Mux2.20 | length 26.6
  Top Layer w0.2: CF-1_RP2.2@9.925,20.9 10.7,20.9 11.75,19.85 11.75,13.65 13.9,11.5 17.4,11.5 18.55,12.65 25.85,12.65 26.7,13.5 Mux2.20@26.7,15
DRTDP3: CF-1_RP3.2 Mux2.21 | length 28.8
  Top Layer w0.2: CF-1_RP3.2@2.5,9.775 2.6,9.775 2.7,9.875 2.7,9.975 3.775,11.05 4.95,11.05 5.85,11.95 10,11.95 10.9,11.05 17.6,11.05 18.7,12.15 26.1,12.15 27.35,13.4 Mux2.21@27.35,15
DRTDP4: CF-1_RP4.2 Mux2.22 | length 14.2
  Top Layer w0.2: CF-1_RP4.2@17.8,9.825 17.9,9.825 18,9.925 18,10.025 19.175,11.2 27.35,11.2 28,11.85 Mux2.22@28,15
DRTDP5: CF-1_RP5.2 Mux2.23 | length 34.9
  Top Layer w0.2: v1(20.05,30.95) 20.5,30.95 20.95,31.4 20.95,32.175 CF-1_RP5.2@20.925,32.2 ; Mux2.23@28.65,15 28.65,13.383 28.767,13.266 29.084,13.266 v1(29.15,13.2)
  Bottom Layer w0.2: v1(20.05,30.95) 19.05,29.95 19.05,13 20.35,11.7 25.65,11.7 25.7,11.65 29.233,11.65 29.35,11.767 29.35,12.892 29.15,13.092 v1(29.15,13.2)
DRTDP6: CF-1_RP6.2 Mux2.24 | length 26
  Top Layer w0.2: v1(20.2,22.5) 20.6,22.5 21.417,21.683 21.417,21.017 21.3,20.9 CF-1_RP6.2@20.925,20.9 ; v1(28.05,16.7) 29,16.7 29.3,16.4 Mux2.24@29.3,15
  Bottom Layer w0.2: v1(20.2,22.5) 20.55,22.15 20.55,14.85 20.4,14.7 20.4,13.85 22,12.25 26.1,12.25 26.45,12.6 26.45,15.1 v1(28.05,16.7)
DRTDP7: CF-13.2 Mux2.25 | length 3.1
  Top Layer w0.2: CF-13.2@29.95,11.925 Mux2.25@29.95,15
DRTDP8: CF-7.2 Mux2.26 | length 3.6
  Top Layer w0.2: Mux2.26@30.6,15 30.6,12.65 31.25,12 31.25,11.925 31.35,11.825 CF-7.2@31.45,11.825
ENWD_SWP1: Iso-2.12 LL-6.1 N1.2 R1-1.2 SWP1_SWP1.5 SWP1_SWP2.5 SWP1_SWP3.5 SWP1_SWP4.5 SWP1_SWP5.5 SWP1_SWP6.5 SWP1_SWP7.5 VReg-2.7 VReg-3.7 | length 444.7
  Top Layer w0.3: Iso-2.12@23.88,157.2 23.92,157.16 R1-1.2@23.92,154.9 ; v1(59.6,24.35) 59.95,24 96.7,24 ; SWP1_SWP1.5@62.19,13.084 62.626,13.084 62.764,12.945 62.764,12.51 62.9,12.374 v1(62.9,12.05) ; SWP1_SWP2.5@71.44,13.084 71.876,13.084 72.014,12.945 72.014,12.51 72.15,12.374 v1(72.15,12.05) ; SWP1_SWP3.5@80.69,13.084 81.126,13.084 81.264,12.945 81.264,12.51 81.4,12.374 v1(81.4,12.05) ; SWP1_SWP4.5@89.94,13.084 90.376,13.084 90.514,12.945 90.514,12.51 90.65,12.374 v1(90.65,12.05) ; v1(96.7,24.45) 96.7,24 ; VReg-2.7@97.168,90.835 97.203,90.8 v1(98.2,90.8) ; VReg-3.7@97.45,46.4 103.1,46.4 105,44.5 105,44.25 106,43.25 v1(106.9,43.25) 106.9,43.326 107.15,43.576 107.15,90.85 ; LL-6.1@98.6,161.637 98.659,161.578 98.659,160.741 101.6,157.8 108.2,157.8 112.7,153.3 v1(112.7,142.4) 112.7,130.6 106.9,124.8 v1(106.9,119.4) ; SWP1_SWP5.5@99.19,13.084 99.626,13.084 99.764,12.945 99.764,12.51 99.9,12.374 v1(99.9,12.05) ; v1(107.2,113.9) 107.15,113.85 107.15,90.85 ; v1(108,90.8) 107.2,90.8 107.15,90.85 ; SWP1_SWP6.5@108.44,13.084 108.876,13.084 109.014,12.945 109.014,12.51 109.15,12.374 v1(109.15,12.05) ; v1(112.3,24) 96.7,24 ; SWP1_SWP7.5@117.69,13.084 118.126,13.084 118.264,12.945 118.264,12.51 118.4,12.374 v1(118.4,12.05)
  Top Layer w0.4: v1(22.5,154.6) 22.8,154.9 R1-1.2@23.92,154.9 ; v1(25.1,148) 25.134,148 25.434,148.3 64.1,148.3 v1(69.9,142.5) ; v1(85,142.5) 85.1,142.4 N1.2@85.1,138.8
  Bottom Layer w0.3: v1(59.6,24.35) 59.657,24.293 59.657,24.08 59.7,24.038 59.7,18.35 62.9,15.15 v1(62.9,12.05) ; v1(68.95,24.35) 68.95,18.35 72.15,15.15 v1(72.15,12.05) ; v1(78.2,24.35) 78.2,18.35 81.4,15.15 v1(81.4,12.05) ; v1(87.45,24.3) 87.45,18.35 90.65,15.15 v1(90.65,12.05) ; v1(96.7,24.45) 96.7,18.35 99.9,15.15 v1(99.9,12.05) ; v1(98.2,90.8) v1(108,90.8) ; v1(105.95,24.3) 105.95,22 105.95,18.35 109.15,15.15 v1(109.15,12.05) ; v1(106.9,43.25) 106.05,42.4 106.05,26.571 106.421,26.2 110.2,26.2 112.15,24.25 112.15,24.231 112.3,24.081 v1(112.3,24) ; v1(106.9,119.4) 106.9,114.226 107.2,113.926 v1(107.2,113.9) ; v1@112.4,24 112.4,23.974 112.7,23.674 112.7,22.5 113.65,21.55 114.85,21.55 115.2,21.2 115.2,18.35 118.4,15.15 v1(118.4,12.05)
  Bottom Layer w0.4: v1(22.5,154.6) 22.5,150.3 24.8,148 v1(25.1,148) ; v1(69.9,142.5) v1(85,142.5) 112.6,142.5 v1(112.7,142.4)
FluxgateEnable: LL-3.1 PWM1.17 VReg-4.7 | length 91.2
  Top Layer w0.2: PWM1.17@85,128.85 87.15,128.85 v1(87.2,128.9) ; v1(87.5,132.55) 91.5,132.55 91.65,132.7 91.65,137.95 97.858,144.158 98.418,144.158 LL-3.1@98.61,144.35
  Top Layer w0.3: v1(76.9,119.6) 76.9,119.574 76.6,119.274 76.6,103.4 v1(77,103) ; v1(87.2,128.9) 88.924,128.9 89.1,128.724 89.1,126.1 88.3,125.3 88.3,119.981 88.1,119.781 v1(88.1,119.7)
  Top Layer w0.5: VReg-4.7@97.168,103.646 v1(98.386,103.646)
  Bottom Layer w0.2: v1(87.2,128.9) 88.15,129.85 88.15,131.9 v1(87.5,132.55)
  Bottom Layer w0.3: v1(76.9,119.6) 76.933,119.633 77.393,119.633 77.526,119.5 87.819,119.5 88.019,119.7 v1(88.1,119.7) ; v1(77,103) 77.1,102.9 86.9,102.9 89.786,105.786 98.386,105.786 v1(98.386,103.646)
FluxgateN: ADC2.4 C8-7.1 C9-4.2 R12-6.2 | length 12.7
  Top Layer w0.2: ADC2.4@76,64.65 78.7,64.65 79.85,63.5 79.85,61.3 80.55,60.6 80.55,60.45 80.95,60.05 C9-4.2@81.4,60.05
  Top Layer w0.3: C9-4.2@81.4,60.05 83.15,60.05 R12-6.2@83.45,60.35 C8-7.1@83.45,58.5
FluxgateNRaw: CLC-6.2 Con_S.2 | length 11.8
  Top Layer w0.2: Con_S.2@36.6,7.6 36.6,7.7 36.625,7.725 37.755,7.725 40.256,10.225 43.725,10.225 45.356,11.856 CLC-6.2@45.356,13.075
FluxgateP: ADC2.5 C8-6.1 C9-4.1 R12-5.2 | length 10.6
  Top Layer w0.2: ADC2.5@76,65.15 79.3,65.15 80.717,63.733 80.717,63.45 81.117,63.05 C9-4.1@81.4,63.05
  Top Layer w0.3: C9-4.1@81.4,63.05 81.424,63.026 82.624,63.026 82.95,62.7 83.15,62.7 R12-5.2@83.45,62.4 ; R12-5.2@83.45,62.2 R12-5.2@83.45,62.4 ; C8-6.1@83.45,64 R12-5.2@83.45,62.4
FluxgatePRaw: CLC-5.2 Con_S.1 | length 16.6
  Top Layer w0.2: Con_S.1@36.6,3.317 36.625,3.292 36.908,3.292 36.929,3.271 37.596,3.271 39.7,4.525 43.875,8.7 45.5,8.7 48.294,11.494 CLC-5.2@48.294,13.075 ; Con_S.1@36.6,3.6 Con_S.1@36.625,3.573